# EAGLE board ecad-flight-controller-v4-ascend-flight-controllerv4-brd (EAGLE 9.7.0)
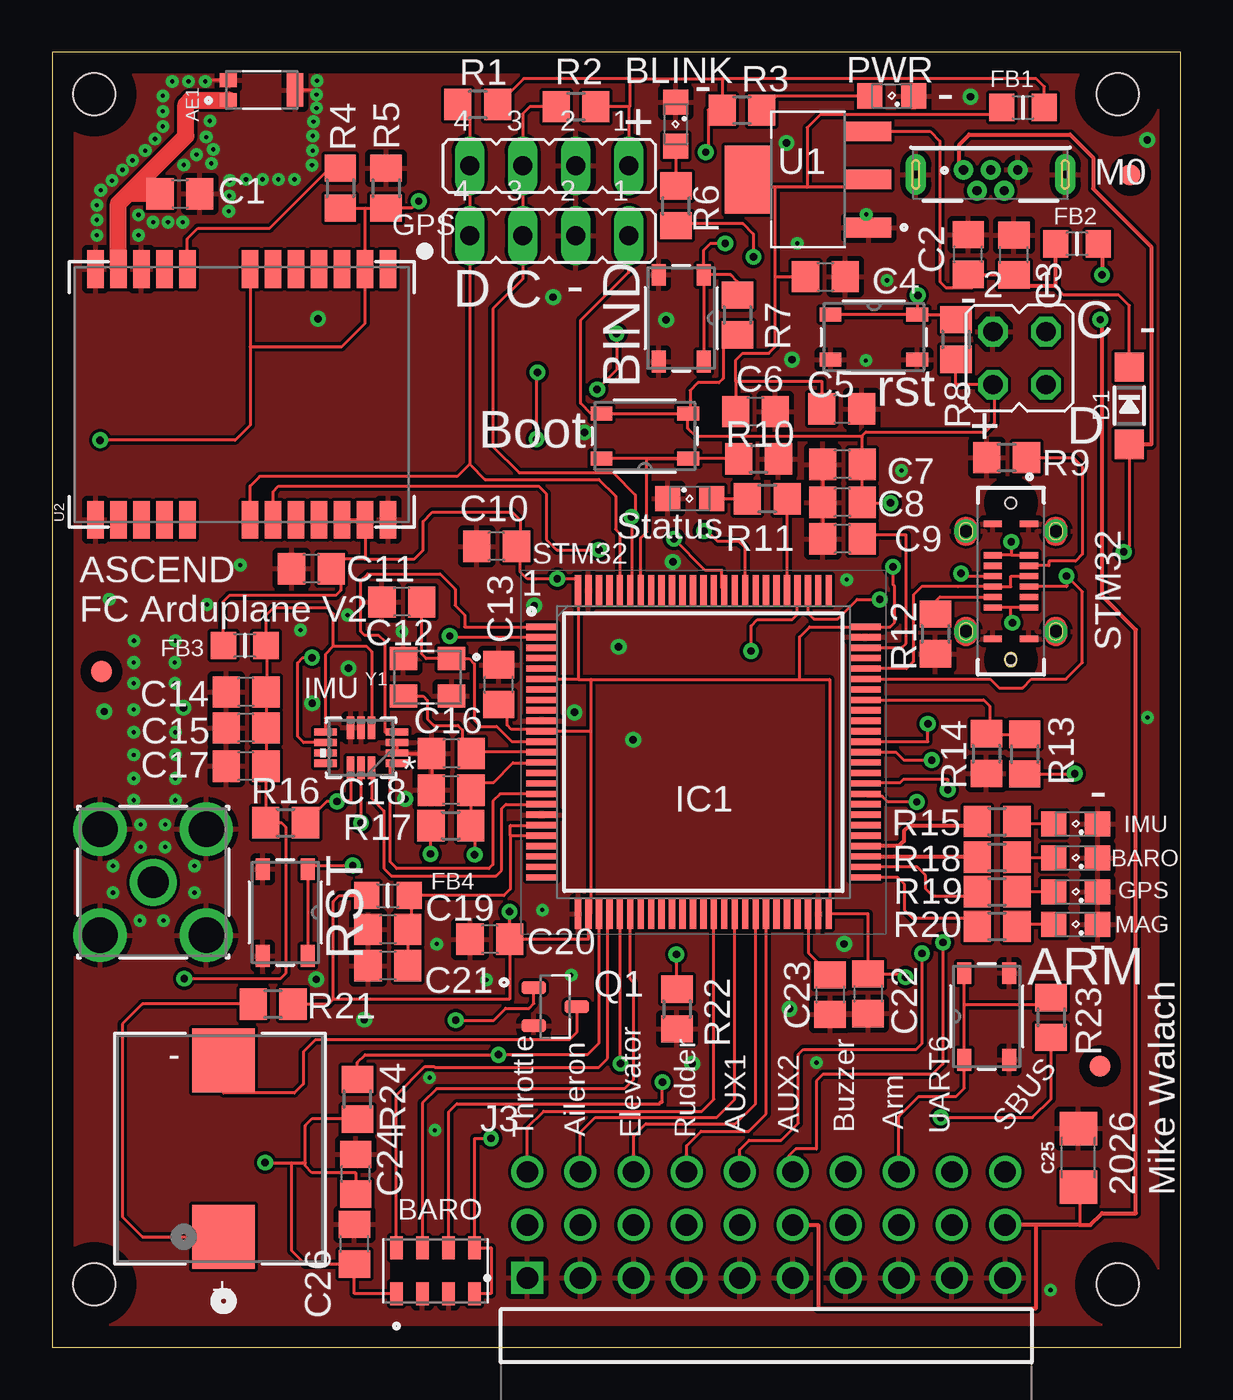
[diagram p0: board, top side]
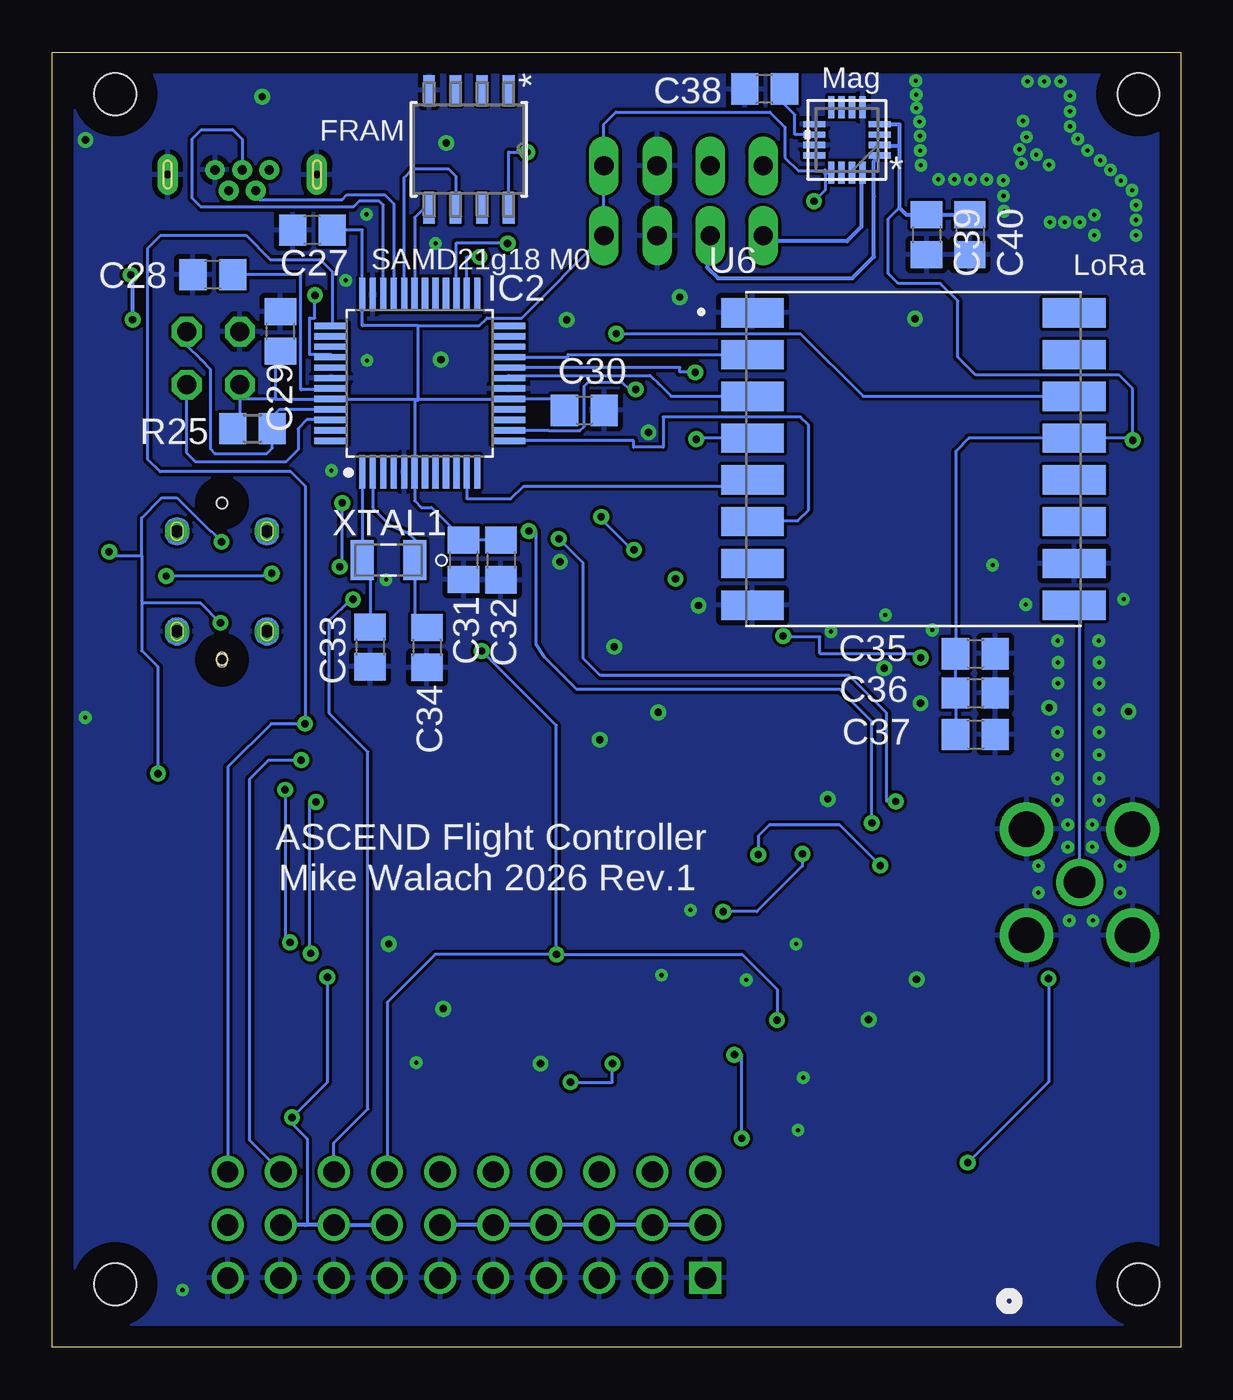
[diagram p1: board, bottom side, seen from below]

Size 54 x 62 mm. Coordinates in mm from the lower left corner, seen from the top.
Outline: 0,0 54,0 54,62 0,62 0,0
Copper layers (1*16): Top 0.035mm / dielectric 1.5mm / Bottom 0.035mm
Design rules "Fusion Electronics Design Rules": minimum track width 6mil, minimum drill 0.35mm, track to track 6mil, track to pad 6mil, pad to pad 6mil, via to via 6mil, smd to smd 6mil, copper to edge 40mil, drill to drill 6mil, minimum pad ring 10mil, minimum via ring 8mil, stop-mask expansion 4mil, vias tented up to drill 9999mil, thermal gap 10mil
Holes 2 mm at 2.02,3.02 50.98,3.02 50.98,59.98 2.02,59.98

## Footprints (pad centres in the part's own frame; a part is rotated, then mirrored left to right if it is on the bottom)
XDCR_MS561101BA03-50 = smd 1.1 x 0.6: 1 -1.1,1.875; 2 -1.1,0.625; 3 -1.1,-0.625; 4 -1.1,-1.875; 5 1.1,-1.875; 6 1.1,-0.625; 7 1.1,0.625; 8 1.1,1.875
XDCR_W3011 = smd 0.65 x 0.8: 1 -0.475,1.6; 2 0.475,1.6 | smd 1.6 x 0.8: 3 0,-1.6
SML0805 = smd 1.2 x 1.2: A 1.05,0; C -1.05,0
C0805 = smd 1.3 x 1.5: 1 -0.95,0; 2 0.95,0
1206 = smd 1.6 x 1.8: 1 -1.4,0; 2 1.4,0
MICROBUILDER_SOD-123 = smd 1.4 x 1.4: A 1.85,0; C -1.85,0
RC-MASTER-SMD_L0805MP = smd 1.2 x 1.3: 1 -1.016,0; 2 1.016,0
FIDUCIAL_1MM = smd 1 x 1: 1 0,0
QFP50P1600X1600X160-100N = smd 1.475 x 0.3: 1 -7.738,6; 2 -7.738,5.5; 3 -7.738,5; 4 -7.738,4.5; 5 -7.738,4; 6 -7.738,3.5; 7 -7.738,3; 8 -7.738,2.5; 9 -7.738,2; 10 -7.738,1.5; 11 -7.738,1; 12 -7.738,0.5; 13 -7.738,0; 14 -7.738,-0.5; 15 -7.738,-1; 16 -7.738,-1.5; 17 -7.738,-2; 18 -7.738,-2.5; 19 -7.738,-3; 20 -7.738,-3.5; 21 -7.738,-4; 22 -7.738,-4.5; 23 -7.738,-5; 24 -7.738,-5.5; 25 -7.738,-6; 51 7.738,-6; 52 7.738,-5.5; 53 7.738,-5; 54 7.738,-4.5; 55 7.738,-4; 56 7.738,-3.5; 57 7.738,-3; 58 7.738,-2.5; 59 7.738,-2; 60 7.738,-1.5; 61 7.738,-1; 62 7.738,-0.5; 63 7.738,0; 64 7.738,0.5; 65 7.738,1; 66 7.738,1.5; 67 7.738,2; 68 7.738,2.5; 69 7.738,3; 70 7.738,3.5; 71 7.738,4; 72 7.738,4.5; 73 7.738,5; 74 7.738,5.5; 75 7.738,6 | smd 0.3 x 1.475: 26 -6,-7.738; 27 -5.5,-7.738; 28 -5,-7.738; 29 -4.5,-7.738; 30 -4,-7.738; 31 -3.5,-7.738; 32 -3,-7.738; 33 -2.5,-7.738; 34 -2,-7.738; 35 -1.5,-7.738; 36 -1,-7.738; 37 -0.5,-7.738; 38 0,-7.738; 39 0.5,-7.738; 40 1,-7.738; 41 1.5,-7.738; 42 2,-7.738; 43 2.5,-7.738; 44 3,-7.738; 45 3.5,-7.738; 46 4,-7.738; 47 4.5,-7.738; 48 5,-7.738; 49 5.5,-7.738; 50 6,-7.738; 76 6,7.738; 77 5.5,7.738; 78 5,7.738; 79 4.5,7.738; 80 4,7.738; 81 3.5,7.738; 82 3,7.738; 83 2.5,7.738; 84 2,7.738; 85 1.5,7.738; 86 1,7.738; 87 0.5,7.738; 88 0,7.738; 89 -0.5,7.738; 90 -1,7.738; 91 -1.5,7.738; 92 -2,7.738; 93 -2.5,7.738; 94 -3,7.738; 95 -3.5,7.738; 96 -4,7.738; 97 -4.5,7.738; 98 -5,7.738; 99 -5.5,7.738; 100 -6,7.738
QFP50P900X900X120-48 = smd 1.6 x 0.3: 1 -4.25,2.75; 2 -4.25,2.25; 3 -4.25,1.75; 4 -4.25,1.25; 5 -4.25,0.75; 6 -4.25,0.25; 7 -4.25,-0.25; 8 -4.25,-0.75; 9 -4.25,-1.25; 10 -4.25,-1.75; 11 -4.25,-2.25; 12 -4.25,-2.75; 25 4.25,-2.75; 26 4.25,-2.25; 27 4.25,-1.75; 28 4.25,-1.25; 29 4.25,-0.75; 30 4.25,-0.25; 31 4.25,0.25; 32 4.25,0.75; 33 4.25,1.25; 34 4.25,1.75; 35 4.25,2.25; 36 4.25,2.75 | smd 0.3 x 1.6: 13 -2.75,-4.25; 14 -2.25,-4.25; 15 -1.75,-4.25; 16 -1.25,-4.25; 17 -0.75,-4.25; 18 -0.25,-4.25; 19 0.25,-4.25; 20 0.75,-4.25; 21 1.25,-4.25; 22 1.75,-4.25; 23 2.25,-4.25; 24 2.75,-4.25; 37 2.75,4.25; 38 2.25,4.25; 39 1.75,4.25; 40 1.25,4.25; 41 0.75,4.25; 42 0.25,4.25; 43 -0.25,4.25; 44 -0.75,4.25; 45 -1.25,4.25; 46 -1.75,4.25; 47 -2.25,4.25; 48 -2.75,4.25
614105150721 = drill 0.44: 1 -1.3,0.125; 2 -0.65,-0.875; 3 0,0.125; 4 0.65,-0.875; 5 1.3,0.125 | drill 0.35 pad 0.97 long: S1 -3.575,-0.095; S2 3.575,-0.095
GCT_USB4120-03-C_REVA6 = smd 0.3 x 0.87: A1 -2.75,0.865; A4 -1.25,0.865; A5 -0.75,0.865; A6 -0.25,0.865; A7 0.25,0.865; A8 0.75,0.865; A9 1.25,0.865; A12 2.75,0.865; B1 2.75,-0.865; B4 1.25,-0.865; B5 0.75,-0.865; B6 0.25,-0.865; B7 -0.25,-0.865; B8 -0.75,-0.865; B9 -1.25,-0.865; B12 -2.75,-0.865 | drill 0.6 pad 1.1: S1 -2.4,2.15; S2 -2.4,-2.15; S3 2.4,2.15; S4 2.4,-2.15 | hole 0.52: -3.75,0; 3.75,0
SAMTEC_TSW-110-08-G-T-RA = drill 1.02 pad 1.37 square: 01 -11.43,2.77 | drill 1.02 pad 1.37: 02 -11.43,5.31; 03 -11.43,7.85; 04 -8.89,2.77; 05 -8.89,5.31; 06 -8.89,7.85; 07 -6.35,2.77; 08 -6.35,5.31; 09 -6.35,7.85; 10 -3.81,2.77; 11 -3.81,5.31; 12 -3.81,7.85; 13 -1.27,2.77; 14 -1.27,5.31; 15 -1.27,7.85; 16 1.27,2.77; 17 1.27,5.31; 18 1.27,7.85; 19 3.81,2.77; 20 3.81,5.31; 21 3.81,7.85; 22 6.35,2.77; 23 6.35,5.31; 24 6.35,7.85; 25 8.89,2.77; 26 8.89,5.31; 27 8.89,7.85; 28 11.43,2.77; 29 11.43,5.31; 30 11.43,7.85
JUMPER_1_JP4 = drill 0.914 long: 1 -3.81,0; 2 -1.27,0; 3 1.27,0; 4 3.81,0
JP2Q = drill 0.914 octagon: 1 -1.27,-1.27; 2 -1.27,1.27; 3 1.27,-1.27; 4 1.27,1.27
SMTB-0927-TW-R_PUI = smd 3.048 x 2.997: 1 -4.225,-0.172; 2 4.225,-0.172
SOT91P240X110-3N = smd 1.18 x 0.61: 1 -1.025,0.915; 2 -1.025,-0.915; 3 1.025,0
R0805 = smd 1.3 x 1.5: 1 -0.95,0; 2 0.95,0
PTS810 = smd 1.041 x 0.66: 1 -2.075,1.075; 2 2.075,1.075; 3 -2.075,-1.075; 4 2.075,-1.075
VREG_TLV1117LV33DCYR = smd 2.15 x 0.95: 1 -2.9,2.3; 2 -2.9,0; 3 -2.9,-2.3 | smd 2.15 x 3.25: 4 2.9,0
GPS_NEO-M9N = smd 1.8 x 0.8: 1 6,-7; 2 6,-5.9; 3 6,-4.8; 4 6,-3.7; 5 6,-2.6; 6 6,-1.5; 7 6,-0.4; 8 6,2.6; 9 6,3.7; 10 6,4.8; 11 6,5.9; 12 6,7; 13 -6,7; 14 -6,5.9; 15 -6,4.8; 16 -6,3.7; 17 -6,2.6; 18 -6,-0.4; 19 -6,-1.5; 20 -6,-2.6; 21 -6,-3.7; 22 -6,-4.8; 23 -6,-5.9; 24 -6,-7
LGA-14L_2P5X3X0P83_STM = smd 1.077 x 0.351: 1 -1.71,0.75; 2 -1.71,0.25; 3 -1.71,-0.25; 4 -1.71,-0.75; 8 1.71,-0.75; 9 1.71,-0.25; 10 1.71,0.25; 11 1.71,0.75 | smd 0.351 x 1.077: 5 -0.5,-0.956; 6 0,-0.956; 7 0.5,-0.956; 12 0.5,0.956; 13 0,0.956; 14 -0.5,0.956
132134_AMP = drill 1.499 pad 2.007: 1 0,0 | drill 1.702 pad 2.21: 2 -2.54,2.54; 3 -2.54,-2.54; 4 2.54,-2.54; 5 2.54,2.54
FPT-8P-M02_FUJ = smd 1.448 x 0.559: 1 -2.832,1.905; 2 -2.832,0.635; 3 -2.832,-0.635; 4 -2.832,-1.905; 5 2.832,-1.905; 6 2.832,-0.635; 7 2.832,0.635; 8 2.832,1.905
XCVR_RFM95W-915S2 = smd 3 x 1.4: 1 -7.7,7; 2 -7.7,5; 3 -7.7,3; 4 -7.7,1; 5 -7.7,-1; 6 -7.7,-3; 7 -7.7,-5; 8 -7.7,-7; 9 7.7,-7; 10 7.7,-5; 11 7.7,-3; 12 7.7,-1; 13 7.7,1; 14 7.7,3; 15 7.7,5; 16 7.7,7
MMC5983MA_MEM = smd 1.054 x 0.305: 1 -1.573,0.75; 2 -1.573,0.25; 3 -1.573,-0.25; 4 -1.573,-0.75; 9 1.573,-0.75; 10 1.573,-0.25; 11 1.573,0.25; 12 1.573,0.75 | smd 0.305 x 1.054: 5 -0.75,-1.573; 6 -0.25,-1.573; 7 0.25,-1.573; 8 0.75,-1.573; 13 0.75,1.573; 14 0.25,1.573; 15 -0.25,1.573; 16 -0.75,1.573
XTAL_ABS07-32.768KHZ-T = smd 1.1 x 1.9: 1 -1.25,0; 2 1.25,0
XTAL_ECS-240-8-33-AGN-TR = smd 1.3 x 1.1: 1 -1.15,-0.9; 2 1.15,-0.9; 3 1.15,0.9; 4 -1.15,0.9

## Placement (x,y rotation side)
A1  MS561101BA03-50  [XDCR_MS561101BA03-50]  18.34,3.67 90 top
AE1  W3011  [XDCR_W3011]  10.02,60.18 90 top
BLINK  [SML0805]  29.84,58.55 270 top
C1  2.2pF  [C0805]  6.11,55.22 0 top
C2  10uF  [C0805]  43.83,52.31 90 top
C3  100nF  [C0805]  46.02,52.29 90 top
C4  0.1uF  [C0805]  37,51.25 0 top
C5  1uF  [C0805]  37.78,44.92 0 top
C6  10uF  [C0805]  33.66,44.8 0 top
C7  4.7uF  [C0805]  37.82,42.27 180 top
C8  100nF  [C0805]  37.82,40.45 180 top
C9  2.2uF  [C0805]  37.82,38.7 180 top
C10  100nF  [C0805]  21.27,38.34 180 top
C11  0.1uF  [C0805]  12.4,37.27 180 top
C12  18pF  [C0805]  16.73,35.68 180 top
C13  100nF  [C0805]  21.37,31.72 90 top
C14  100nF  [C0805]  9.28,31.37 180 top
C15  1uF  [C0805]  9.28,29.65 180 top
C16  18pF  [C0805]  19.1,28.43 180 top
C17  100nF  [C0805]  9.28,27.82 180 top
C18  100nF  [C0805]  19.09,26.67 180 top
C19  100nF  [C0805]  16.06,20.01 180 top
C20  100nF  [C0805]  20.95,19.53 180 top
C21  1uF  [C0805]  16.06,18.27 180 top
C22  100nF  [C0805]  39.05,16.92 270 top
C23  2.2uF  [C0805]  37.23,16.88 270 top
C24  1uF  [C0805]  14.52,8.29 90 top
C25  220uF  [1206]  49.11,9.08 90 top
C26  100nF  [C0805]  14.46,4.93 90 top
C27  0.1uF  [C0805]  41.54,53.48 180 bottom
C28  1uF  [C0805]  46.32,51.35 180 bottom
C29  0.1uF  [C0805]  43.08,48.64 90 bottom
C30  0.1uF  [C0805]  28.54,44.86 0 bottom
C31  1uF  [C0805]  34.31,37.7 270 bottom
C32  0.1uF  [C0805]  32.52,37.69 270 bottom
C33  22pF  [C0805]  38.79,33.53 270 bottom
C34  22pF  [C0805]  36.07,33.5 270 bottom
C35  10uF  [C0805]  9.82,33.21 0 bottom
C36  0.1uF  [C0805]  9.82,31.32 0 bottom
C37  1uF  [C0805]  9.82,29.34 0 bottom
C38  10uF  [C0805]  19.91,60.23 180 bottom
C39  100nF  [C0805]  12.16,53.27 270 bottom
C40  100nF  [C0805]  10.09,53.27 270 bottom
D1  [MICROBUILDER_SOD-123]  51.54,45.08 270 top
FB1  [RC-MASTER-SMD_L0805MP]  46.46,59.36 0 top
FB2  [RC-MASTER-SMD_L0805MP]  49.04,52.82 180 top
FB3  [RC-MASTER-SMD_L0805MP]  9.21,33.6 180 top
FB4  [RC-MASTER-SMD_L0805MP]  16.06,21.63 0 top
FID1  FIDUCIAL""  [FIDUCIAL_1MM]  2.35,32.35 0 top
FID2  FIDUCIAL""  [FIDUCIAL_1MM]  51.59,56.12 0 top
FID3  FIDUCIAL""  [FIDUCIAL_1MM]  50.14,13.46 0 top
IC1  STM32H743VIT6  [QFP50P1600X1600X160-100N]  31.16,28.49 0 top
IC2  ATSAMD21G  [QFP50P900X900X120-48]  36.41,46.15 90 bottom
J1  614105150721  [614105150721]  44.91,56.24 0 top
J2  USB4120-03-C_REVA6  [GCT_USB4120-03-C_REVA6]  45.88,36.67 270 top
J3  TSW-110-08-G-T-RA  [SAMTEC_TSW-110-08-G-T-RA]  34.17,0.55 0 top
JP1  [JUMPER_1_JP4]  23.79,56.56 180 top
JP2  [JUMPER_1_JP4]  23.79,53.22 180 top
JP3  [JP2Q]  46.29,47.35 180 top
LED4  [SML0805]  48.97,25.05 180 top
LED5  [SML0805]  48.97,23.42 180 top
LED6  [SML0805]  48.97,21.8 180 top
LED7  [SML0805]  48.97,20.24 180 top
LS1  SMTB-0927-TW-RSMTB-0927-TW-R_PUI  [SMTB-0927-TW-R_PUI]  8.03,9.51 90 top
PWR  [SML0805]  40.17,59.91 180 top
Q1  2N7002K-7  [SOT91P240X110-3N]  24.07,16.31 0 top
R1  10k  [R0805]  20.36,59.49 180 top
R2  10k  [R0805]  25.07,59.39 180 top
R3  2.2K  [R0805]  33.01,59.23 0 top
R4  1K  [R0805]  13.79,55.49 270 top
R5  100K  [R0805]  15.98,55.49 270 top
R6  2.2K  [R0805]  29.85,54.65 90 top
R7  1K  [R0805]  32.79,49.42 270 top
R8  1K  [R0805]  43.25,48.25 270 top
R9  5.1K  [R0805]  45.68,42.59 180 top
R10  10k  [R0805]  33.8,42.53 0 top
R11  2.2K  [R0805]  34.22,40.62 180 top
R12  5.1K  [R0805]  42.27,34.15 270 top
R13  4.7k  [R0805]  46.54,28.4 90 top
R14  10k  [R0805]  44.71,28.42 270 top
R15  2.2K  [R0805]  45.22,25.17 0 top
R16  10k  [R0805]  11.17,25.11 0 top
R17  10k  [R0805]  19.07,24.98 0 top
R18  2.2K  [R0805]  45.22,23.46 0 top
R19  2.2K  [R0805]  45.22,21.8 0 top
R20  2.2K  [R0805]  45.22,20.15 0 top
R21  0-100  [R0805]  10.57,16.43 180 top
R22  100k  [R0805]  29.89,16.19 270 top
R23  1K  [R0805]  47.8,15.79 270 top
R24  10k  [R0805]  14.6,11.88 90 top
R25  1K  [R0805]  44.42,43.98 0 bottom
STATUS  [SML0805]  30.51,40.64 0 top
SW1  PTS810SJG250SMTRLFSPTS810  [PTS810]  30.1,49.27 270 top
SW2  PTS810SJG250SMTRLFSPTS810  [PTS810]  39.32,48.36 0 top
SW3  PTS810SJG250SMTRLFSPTS810  [PTS810]  28.36,43.62 180 top
SW4  PTS810SJG250SMTRLFSPTS810  [PTS810]  11.15,20.81 270 top
SW5  PTS810SJG250SMTRLFSPTS810  [PTS810]  44.73,15.84 90 top
U1  TLV1117LV33DCYR  [VREG_TLV1117LV33DCYR]  36.17,55.91 180 top
U2  GPS_U-BLOX_NEO-M9N  [GPS_NEO-M9N]  9.07,45.62 90 top
U3  LSM6DSO32TRLGA-14L_2P5X3X0P83_STM  [LGA-14L_2P5X3X0P83_STM]  14.78,28.7 180 top
U4  132134132134_AMP  [132134_AMP]  4.83,22.27 0 top
U5  MB85RC256VPNF-G-JNERE1FPT-8P-M02_FUJ  [FPT-8P-M02_FUJ]  34.06,57.35 270 bottom
U6  RFM95W-915S2  [XCVR_RFM95W-915S2]  12.79,42.53 0 bottom
U7  MMC5983MAMMC5983MA_MEM  [MMC5983MA_MEM]  15.97,57.8 180 bottom
XTAL1  32.768kHz  [XTAL_ABS07-32.768KHZ-T]  37.91,37.69 180 bottom
Y1  ECS-80-12-33-JGN-TR3  [XTAL_ECS-240-8-33-AGN-TR]  17.96,32.07 180 top

## Library data of the parts
A1 = MS561101BA03-50; MANUFACTURER: TE Connectivity; MAXIMUM_PACKAGE_HEIGHT: 1.1mm; PARTREV: 06/2017; STANDARD: Manufacturer Recommendations
AE1 = W3011; MANUFACTURER: PulseLarsen; MAXIMUM_PACKAGE_HEIGHT: 1.3 mm; PARTREV: N/A; STANDARD: Manufacturer recommendations
BLINK LED4-LED7 PWR STATUS = led
C1-C24 C26-C40 = rcl; SPICEPREFIX: C
C25 = SparkFun-Capacitors; PROD_ID: CAP-09822
D1 = flightcomputer-2023
FB1-FB4 = 52101-101-REV-A_v16
FID1-FID3 = Airquality_Sensor; BOM: EXCLUDE
IC1 = STM32H743VIT6; DESCRIPTION: ARM Microcontrollers - MCU High-performance and DSP with DP-FPU, ARM Cortex-M7 MCU with 2MBytes Flash, 1MB RAM, 400 MHz CPU, Art Accelerator, L1 cache, external memory interface, large set of peripherals; HEIGHT: 1.6mm; MANUFACTURER_NAME: STMicroelectronics; MANUFACTURER_PART_NUMBER: STM32H743VIT6; MOUSER_PART_NUMBER: 511-STM32H743VIT6; MOUSER_PRICE-STOCK: https://www.mouser.co.uk/ProductDetail/STMicroelectronics/STM32H743VIT6?qs=FNcb6ahWXRw0Me5k2ZHgWw%3D%3D
IC2 = IC_Embedded; CATEGORY: IC_Embedded; CORE: ARM Cortex M0+; DESCRIPTION: Low-power, high-performance Microchip's ARM® Cortex®-M0+ based flash microcontroller; MANUFACTURER: Microchip Technology; MPN: ATSAMD21G; OPERATING_TEMP: variable; PACKAGE: TQFP-48; PART_STATUS: Active; ROHS_COMPLIANT: COMPLIANT; SERIES: SAM D21G; SUB-CATEGORY: Microcontroller; TYPE: 32 bit Microcontroller
J1 = 614105150721
J2 = USB4120-03-C_REVA6; MANUFACTURER: Global Connector Technology; MAXIMUM_PACKAGE_HEIGHT: 6.5mm; PARTREV: A6; SNAPEDA_PN: USB4120-03-C; STANDARD: Manufacturer Recommendations
J3 = TSW-110-08-G-T-RA; MANUFACTURER: Samtec; PARTREV: R; STANDARD: Manufacturer Recommendations
JP1 JP2 = BOBCAT_Library
JP3 = jumper
LS1 = 2026-06-20_23-40-30_Library; COPYRIGHT: Copyright (C) 2026 Ultra Librarian. All rights reserved.; MANUFACTURER_NAME: PUI Audio; MANUFACTURER_PART_NUMBER: SMTB-0927-TW-R
Q1 = 2N7002K-7; MANUFACTURER: Diodes Inc.; MAXIMUM_PACKAGE_HIEGHT: 1.1mm; PARTREV: 15-2; STANDARD: IPC7351B
R1-R25 = rcl; SPICEPREFIX: R
SW1-SW5 = 2024-06-17_17-27-14_Library; COPYRIGHT: Copyright (C) 2024 Ultra Librarian. All rights reserved.; MANUFACTURER_PART_NUMBER: PTS810SJG250SMTRLFS; MFR_NAME: C&K Components
U1 = TLV1117LV33DCYR; MANUFACTURER: Texas Instruments; MAXIMUM_PACKAGE_HEIGHT: 1.80 mm; PARTREV: B; STANDARD: IPC-7351B
U2 = SparkFun GPS NEO_M9N_ANT; PROD_ID: IC-14651
U3 = LSM6DSO32TR_extendedpads_fixed_v2; COPYRIGHT: Copyright (C) 2026 Ultra Librarian. All rights reserved.; DATASHEET: https://www.st.com/resource/en/datasheet/lsm6dso32.pdf; DESCRIPTION: 6-axis IMU (inertial measurement unit): 3-axis accelerometer and 3-axis gyroscope; MANUFACTURER_NAME: STMicroelectronics; MANUFACTURER_PART_NUMBER: LSM6DSO32TR
U4 = 2025-03-19_02-22-58_Library; COPYRIGHT: Copyright (C) 2025 Ultra Librarian. All rights reserved.; MANUFACTURER_PART_NUMBER: 132134; MFR_NAME: Amphenol ICC
U5 = 2025-09-02_13-41-18_Library; COPYRIGHT: Copyright (C) 2025 Ultra Librarian. All rights reserved.; MANUFACTURER_NAME: Fujitsu Semiconductor; MANUFACTURER_PART_NUMBER: MB85RC256VPNF-G-JNERE1
U6 = RFM95W-915S2; AVAILABILITY: In Stock; CHECK_PRICES: https://www.snapeda.com/parts/RFM95W-915S2/RF/view-part/?ref=eda; DESCRIPTION: 802.15.4 LoRa™ Transceiver Module 915MHz Antenna Not Included Surface Mount; MF: RF Solutions; MP: RFM95W-915S2; PACKAGE: Non Standard RF Solutions; PRICE: None; PURCHASE-URL: https://www.snapeda.com/api/url_track_click_mouser/?unipart_id=585488&manufacturer=RF Solutions&part_name=RFM95W-915S2&search_term=None; SNAPEDA_LINK: https://www.snapeda.com/parts/RFM95W-915S2/RF/view-part/?ref=snap
U7 = MMC5983MA_SAME_SYMBOL_HANDSOLDER; COPYRIGHT: Copyright (C) 2026 Ultra Librarian. All rights reserved.; MANUFACTURER_NAME: Memsic; MANUFACTURER_PART_NUMBER: MMC5983MA
XTAL1 = Crystal-WA; CATEGORY: Crystal; MANUFACTURER: Abracon LLC; MPN: ABS07-32.768KHZ-T; OPERATING_TEMPERATURE: -40°C ~ 85°C; PART_STATUS: ACTIVE; ROHS_COMPLIANT: COMPLIANT; SERIES: ABS07; SUB_CATEGORY: Crystal Surface Mount; TYPE: Crystal
Y1 = ECS-80-12-33-JGN-TR3; AVAILABILITY: Good; DESCRIPTION: The sub miniature ECX-32 is a compact SMD Crystal.; MF: ECS INC; MP: ECX-32; PACKAGE: SMD-4 ECX; STANDARD: Manufacturer recommendations

## Nets
5V-SERVO-RAIL: C25.1 FB2.1 J3.02 J3.05 J3.08 J3.11 J3.14 J3.17 J3.29
+3V3: C7.1 C8.1 C10.1 C11.1 C13.1 C20.1 C22.1 C27.1 C29.1 C30.1 C31.1 C32.1 C35.1 C36.1 C37.1 C39.1 C40.1 FB1.2 FB3.2 FB4.1 IC1.6 IC1.11 IC1.27 IC1.50 IC1.75 IC1.100 IC2.6 IC2.17 IC2.36 IC2.44 J3.20 J3.23 J3.26 JP1.1 JP2.1 JP3.4 R1.1 R2.1 R3.1 R4.2 R5.2 R7.2 R8.2 R17.1 R21.1 R23.2 R25.1 SW3.3 SW3.4 U2.2 U2.7 U2.22 U2.23 U5.8 U6.13 U7.2 U7.4 U7.13
A0: IC2.3
A1: IC2.7
A2: IC2.8
A3: IC2.9
A4: IC2.10
A5: IC2.47
ACCEL_CS: IC1.85
AILERON: IC1.41 J3.06
AREF: IC2.4
ARMING_BUTTON: IC1.78 J3.24 R23.1 SW5.1 SW5.2
AUX1: IC1.59 J3.15
AUX2: IC1.60 J3.18
BARO_CS: A1.4 A1.5 IC1.28 R24.2
BIND: IC2.27 R7.1 SW1.1 SW1.2
BLINK: IC1.80 R11.1
BOOT0: IC1.94 R10.1 SW3.1 SW3.2
BUZZER: IC1.79 J3.21 Q1.1 R22.1
D0: IC2.16
D1: IC2.15
D2: IC2.23
D5: IC2.24
D6: IC2.29
D7: IC2.30
D9: IC2.12
D12: IC2.28
D13: IC2.26 R6.1
D+: IC2.34 J1.3
D-: IC2.33 J1.2
DIO0: IC2.14 U6.14
DIO1: U6.15
DIO2: U6.16
DIO3: U6.11
DIO4: U6.12
DIO5: U6.7
ELEVATOR: IC1.43 J3.09
FILTERED-3.3V: A1.1 C14.1 C15.1 C17.1 C24.1 C26.1 FB3.1 R16.1 R24.1 U3.5 U3.8
GND: A1.2 A1.3 AE1.2 AE1.3 BLINK.C C1.2 C2.2 C3.2 C4.2 C5.2 C6.2 C7.2 C8.2 C9.2 C10.2 C11.2 C12.2 C13.2 C14.2 C15.2 C16.2 C17.2 C18.2 C19.2 C20.2 C21.2 C22.2 C23.2 C24.2 C25.2 C26.2 C27.2 C28.2 C29.2 C30.2 C31.2 C32.2 C33.2 C34.2 C35.2 C36.2 C37.2 C38.2 C39.2 C40.2 IC1.10 IC1.19 IC1.26 IC1.49 IC1.74 IC1.99 IC2.5 IC2.18 IC2.35 IC2.42 J1.5 J1.S1 J1.S2 J2.A1 J2.A12 J2.B1 J2.B12 J2.S1 J2.S2 J2.S3 J2.S4 J3.01 J3.04 J3.07 J3.10 J3.13 J3.16 J3.19 J3.22 J3.25 J3.28 JP1.2 JP2.2 JP3.3 LED4.C LED5.C LED6.C LED7.C PWR.C Q1.2 R5.1 R9.2 R10.2 R12.2 R14.2 R22.2 STATUS.C SW1.3 SW1.4 SW2.3 SW2.4 SW4.3 SW4.4 SW5.3 SW5.4 U1.1 U2.10 U2.12 U2.13 U2.24 U3.2 U3.3 U3.6 U3.7 U4.2 U4.3 U4.4 U4.5 U5.4 U6.1 U6.8 U6.10 U7.5 U7.9 U7.11 Y1.2 Y1.4
GPS-HEALTH: IC1.52 R19.1
GPS_ANT1: AE1.1 C1.1 U2.11
GYRO_CS: IC1.86 R16.2 U3.12
I2C1_SCL: IC1.95 JP1.3 JP2.3 R2.2 U2.19 U7.1
I2C1_SDA: IC1.96 JP1.4 JP2.4 R1.2 U2.18 U7.16
IMU-HEALTH: IC1.54 R15.1
IMU_INT1: IC1.1 U3.4
IMU_INT2: IC1.2 U3.9
LORA_ANT: U4.1 U6.9
LORA_RESET: IC2.13 U6.6
MAGNATOMETER-HEALTH: IC1.51 R20.1
MISO: IC2.21 U6.2
MOSI: IC2.19 U6.3
N$1: C9.1 IC1.73
N$2: C23.1 IC1.48
N$3: C19.1 C21.1 FB4.2 IC1.20 IC1.21
N$4: R4.1 U2.8
N$5: LS1.1 R21.2
N$6: LS1.2 Q1.3
N$7: LED4.A R15.2
N$8: R11.2 STATUS.A
N$9: C4.1 C5.1 C6.1 FB1.1 U1.2 U1.4
N$11: C2.1 C3.1 D1.C FB2.2 U1.3
N$12: LED5.A R18.2
N$13: C28.1 IC2.43
N$14: LED6.A R19.2
N$15: LED7.A R20.2
N$16: C34.1 IC2.2 XTAL1.1
N$17: C33.1 IC2.1 XTAL1.2
N$19: BLINK.A R6.2
N$20: U5.7
N$21: U5.3
N$22: U5.2
N$23: U5.1
N$27: C38.1 U7.10
N$30: PWR.A R3.2
N$33: J2.A5 R9.1
N$34: J2.B5 R12.1
NRST: C18.1 IC1.14 R17.2 SW4.1 SW4.2
NSS: IC2.11 U6.5
OSC-IN: C12.1 IC1.12 Y1.1
OSC-OUT: C16.1 IC1.13 Y1.3
PRESSURE-HEALTH: IC1.53 R18.1
RCIN_SBUS: IC1.64 IC2.37 J3.30
RESET: IC2.40 R8.1 SW2.1 SW2.2
RUDDER: IC1.44 J3.12
RXD: IC2.38
RXLED: IC2.48
SCK: IC2.20 U6.4
SCL: IC2.32 U5.6
SDA: IC2.31 U5.5
SPI1_MISO: A1.6 IC1.30
SPI1_MOSI: A1.7 IC1.31
SPI1_SCK: A1.8 IC1.29
SPI2_MISO: IC1.17 U3.1
SPI2_MOSI: IC1.18 U3.14
SPI2_SCK: IC1.84 U3.13
SW3: IC2.25
SWCLK: IC2.45 JP3.1 R25.2
SWCLK_STM32: IC1.76
SWDIO: IC2.46 JP3.2
SWDIO_STM32: IC1.72
THROTTLE: IC1.39 J3.03
TXLED: IC2.39
USART1_RX: IC1.93
USART1_TX: IC1.92
USART6_TX: IC1.63 J3.27
USB_5V: D1.A J1.1 J2.A4 J2.A9 J2.B4 J2.B9 R13.1
USB_D+: IC1.71 J2.A6 J2.B6
USB_D−: IC1.70 J2.A7 J2.B7
USB_VBUS_SENSE: IC1.68 R13.2 R14.1

## Tracks (layer width: path | path; a pad name or v marks a point on that pad's centre or on a via)
5V-SERVO-RAIL  (via drill 0.35)
  Top 0.152: C25.1 49.17,7.62 49.17,5.86
  Top 0.203: v50.24,51.34 50.24,52.82 FB2.1 | v50.15,49.2 50.24,49.11 50.24,35.96 51.86,34.34 51.86,6.42 50.24,6.42 49.68,5.86 49.17,5.86 47.09,5.86 | J3.17 36.66,5.86 36.66,1.87 47.09,1.87 47.09,5.86 | 47.09,5.86 J3.29
  Bottom 0.203: v50.15,49.2 50.15,51.34 v50.24,51.34 | J3.02 J3.05 J3.08 J3.11 J3.14 J3.17
+3V3  (via drill 0.35)
  Top 0.152: C20.1 25.66,19.53 IC1.27 25.78,20.75 25.78,29.49 | R17.1 18.12,23.61 v18.1,23.61 | v21.88,20.86 21.88,19.53 C20.1 | C20.1 21.9,16.66 13.46,16.66 | 13.46,16.66 13.46,21.34 13.75,21.63 FB4.1 | R7.2 32.79,48.36 | 32.79,48.36 32.79,48.14 | 37.2,20.75 39.05,20.75 C22.1 40.83,17.87 v40.83,17.72 | 37.2,20.75 IC1.50 | SW3.4 26.56,44.7 | v40.12,40.42 38.77,40.42 C8.1 C7.1 38.77,43.59 38.71,43.59 | SW3.4 SW3.3 | 38.71,43.59 30.81,43.59 30.41,43.98 30.41,44.7 SW3.3 | SW3.3 30.52,44.7 30.52,45.8 30.9,46.18 31.9,46.18 32.11,46.39 32.11,48.36 32.79,48.36 | 27.6,59.39 27.64,59.39 27.64,60.74 | 27.6,59.39 R2.1 | 27.6,59.39 JP1.1 | 27.64,60.74 22.56,60.74 R1.1 | 27.64,60.74 32.06,60.74 | 32.06,60.74 R3.1 31.39,59.23 31.39,57.34 v31.27,57.22 | SW3.4 25.78,44.7 25.29,45.19 25.29,49.17 27.6,51.47 JP2.1 | 14.97,37.73 U2.23 U2.22 | 14.97,37.73 17.32,37.73 17.75,38.16 17.75,39.54 18.2,39.98 22.02,39.98 22.41,39.59 22.41,38.34 | 22.41,38.34 C10.1 | 22.41,38.34 22.41,37.12 22.74,36.79 v24.17,36.79 25.16,36.79 IC1.100 25.16,31.97 | 25.16,31.97 23.42,31.97 IC1.6 | 25.16,31.97 25.78,31.97 | 25.78,31.97 35.76,31.97 | 35.76,31.97 35.76,34.01 36.24,34.49 IC1.75 40.1,34.49 40.31,34.71 40.31,36.44 40.24,36.51 v40.24,37.36 | 25.78,31.97 25.78,29.49 | 35.76,31.97 37.2,31.97 37.2,20.75 | C13.1 21.77,30.37 21.77,29.78 21.97,29.58 23.34,29.58 IC1.11 25.78,29.49 | R8.2 43.25,46.08 JP3.4 45.1,46.08 45.1,44.27 44.66,43.82 38.94,43.82 38.71,43.59 | 14.97,37.73 13.35,37.73 C11.1 13.8,37.27 13.8,36.23 13.57,36 8.48,36 8.17,35.69 8.17,33.62 FB3.2 | v42.52,11 46.91,11 47.8,11.89 R23.2 | FB1.2 47.48,60.35 47.09,60.74 32.06,60.74
  Top 0.152: R21.1 13.23,16.43 13.46,16.66 | U2.7 9.47,47.9 | 9.47,47.9 9.47,44.14 8.76,43.43 v2.29,43.43 | v17.54,54.87 17.22,54.54 R5.2 14.99,54.54 | R4.2 14.99,54.54 | 14.99,54.54 14.97,54.52 U2.2 14.97,49.02 13.85,47.9 9.47,47.9
  Bottom 0.152: v18.1,23.61 18.1,23.03 20.28,20.86 v21.88,20.86 | v40.12,40.42 40.15,40.42 40.15,37.36 v40.24,37.36 | R25.1 45.02,43.98 45.02,45.4 | 45.02,45.4 JP3.4 | 43.33,45.4 IC2.44 36.51,45.4 | 43.33,45.4 45.02,45.4 | 34.29,38.65 35.84,40.21 36.33,40.21 36.66,40.53 IC2.6 36.66,45.33 36.51,45.33 | 34.29,38.65 C31.1 | C30.1 30.05,45.42 32.14,45.42 IC2.17 36.51,45.4 | 36.51,45.4 36.51,45.33 | 36.5,48.9 39.16,48.9 IC2.36 39.16,53.48 C27.1 | 36.5,48.9 36.5,45.33 36.51,45.33 | C29.1 43.33,47.69 43.33,45.4 | C32.1 34.29,38.64 34.29,38.65 | 10.67,31.32 10.74,31.32 | 10.74,31.32 C36.1 C35.1 | 36.5,48.9 33.57,48.9 33.19,49.28 31.53,49.28 JP2.1 JP1.1 27.6,58.56 27.02,59.13 19.65,59.13 18.93,58.42 18.93,56.96 18.31,56.33 17.01,56.33 17.01,55.41 v17.54,54.87 | v40.83,17.72 40.83,12.69 v42.52,11 42.52,10.69 41.8,9.97 41.8,5.86 41.88,5.86 | U5.8 32.16,57.22 v31.27,57.22 | 10.67,33.21 C35.1 | C37.1 10.74,29.34 10.74,31.32 | C35.1 10.77,42.89 10.14,43.53 U6.13 2.29,43.53 v2.29,43.43 2.29,45.9 2.94,46.54 9.8,46.54 10.66,47.41 10.66,50.1 11.49,50.93 13.51,50.93 13.98,51.4 13.98,54.02 13.46,54.55 | 12.83,54.55 12.83,54.22
  Bottom 0.2: U7.4 13.46,58.55 13.46,57.51 | 13.46,57.51 14.4,57.51 U7.2 | U7.13 17.01,56.23 17.01,56.33 | 13.46,57.51 13.46,54.55 13.12,54.22 12.83,54.22 C39.1 10.18,54.22
  Bottom 0.203: J3.26 41.88,5.86 J3.23 J3.20
AILERON
  Top 0.152: J3.06 25.28,10.29 25.99,11 31.8,11 32.66,11.87 IC1.41
ARMING_BUTTON  (via drill 0.35)
  Top 0.152: SW5.2 43.65,16.4 | 43.65,16.4 SW5.1 43.65,12.4 43.25,12 41.47,12 40.52,11.05 J3.24 | R23.1 47.8,16.4 43.65,16.4 | IC1.78 36.16,35.16 36.45,34.87 37.59,34.87 38.52,35.8 v39.6,35.8
  Bottom 0.152: J3.24 40.52,9.78 38.9,11.41 38.9,28.5 40.74,30.35 40.74,34.79 39.73,35.8 v39.6,35.8
AUX1  (via drill 0.35)
  Top 0.152: v41.38,26.11 | J3.15 32.9,9.46 33.35,9.91 34.88,9.91 35.71,10.73 35.71,14.02 35.95,14.26 41.34,14.26 41.63,14.54 v41.63,18.86 | IC1.59 39.02,26.37 39.73,26.37 40,26.11 v41.38,26.11
  Bottom 0.152: v41.38,26.11 41.7,26.11 41.7,18.93 v41.63,18.86
AUX2  (via drill 0.35)
  Top 0.152: IC1.60 38.9,27.05 40.59,27.05 40.74,27.2 42.85,27.2 v42.85,26.69 | v42.63,19.38 42.63,13.56 42.12,13.06 36.88,13.06 36.57,12.75 36.57,9.49 35.58,9.49 35.23,9.13 35.23,8.4 J3.18
  Bottom 0.152: v42.85,26.69 42.85,19.61 v42.63,19.38
BARO_CS  (via drill 0.35)
  Top 0.152: 14.6,12.93 R24.2 14.6,13.63 14.97,14 v21.36,14 25.62,14 26.16,14.55 IC1.28 | A1.4 21,2.57 21,4.77 A1.5 20.22,10 v21,10
  Bottom 0.152: v21,10 21,14 v21.36,14
BIND  (via drill 0.35)
  Top 0.152: 32.79,50.3 R7.1 32.79,51.02 32.47,51.34 SW1.1 | SW1.1 31.17,52.52 31.51,52.85 v32.2,52.85 | SW1.1 SW1.2
  Bottom 0.152: IC2.27 34.66,52.87 32.23,52.87 v32.2,52.85
BLINK
  Top 0.152: R11.1 IC1.80
BOOT0
  Top 0.152: IC1.94 28.16,38.74 28.46,39.04 28.46,42.55 SW3.1 | SW3.1 SW3.2 | R10.1 32.84,42.55 SW3.1
BUZZER  (via drill 0.35)
  Top 0.152: R22.1 29.89,18.81 v29.87,18.81 | v33.44,33.33 33.44,34.53 33.74,34.83 35.41,34.83 35.66,35.09 IC1.79 | v19.31,15.66 21.13,15.66 21.7,16.23 22.82,16.23 23.05,16.46 Q1.1
  Bottom 0.152: v29.87,18.81 29.87,29.77 29.88,29.77 v33.44,33.33 | v29.87,18.81 20.98,18.81 19.31,17.14 v19.31,15.66 | v29.87,18.81 35.67,18.81 37.98,16.5 J3.21
D13  (via drill 0.35)
  Top 0.152: R6.1 29.94,53.78 33.07,53.78 33.56,53.3 v33.56,52.2
  Bottom 0.152: IC2.26 34.16,52.2 v33.56,52.2
D+
  Bottom 0.152: J1.3 44.91,57.84 45.37,58.29 46.86,58.29 47.3,57.85 47.3,55.01 46.88,54.59 39.59,54.59 39.31,54.87 38.35,54.87 38.16,54.68 IC2.34
D-
  Bottom 0.152: J1.2 44.26,55.11 44.1,54.95 40.12,54.95 39.9,55.18 38.08,55.18 37.66,54.76 IC2.33
DIO0  (via drill 0.35)
  Top 0.152: v27.01,48.53 27.01,46.79 v26.08,45.86
  Bottom 0.152: U6.14 15.2,45.53 18.18,48.51 26.64,48.51 26.83,48.71 v27.01,48.53 | v26.08,45.86 26.39,45.86 26.74,46.22 28.34,46.22 28.54,46.02 28.54,44.09 28.74,43.88 30.23,43.88 30.26,43.9 IC2.14
ELEVATOR
  Top 0.152: J3.09 27.82,10.11 28.41,10.7 32.7,10.7 33.66,11.66 IC1.43
FILTERED-3.3V  (via drill 0.35)
  Top 0.152: 13.46,33.56 13.07,33.17 U3.8 | 13.46,33.56 15.03,33.56 15.29,33.31 U3.5 | 13.46,33.56 13.46,35.11 13.19,35.38 10.57,35.38 10.23,35.04 FB3.1 10.26,33.56 10.26,31.4 C14.1 C15.1 C17.1 10.22,27.81 R16.1 10.97,25.11 11.16,24.92 11.16,17.89 10.92,17.64 v6.32,17.64 | R24.1 14.6,10.96 12.45,10.96 12.11,10.62 12.11,8.84 | 14.46,4.34 C26.1 | C26.1 12.1,3.98 11.45,4.63 11.45,8.84 | v10.19,8.84 11.45,8.84 | 11.45,8.84 11.98,8.84 12.11,8.84 | 12.11,8.84 12.11,8.68 12.43,8.36 14.52,8.36 C24.1 | A1.1 14.46,2.57 C26.1
  Bottom 0.152: v6.32,17.64 6.32,12.71 v10.19,8.84
GND  (via drill 0.2, 0.35)
  Top 0.152: C18.2 18.15,26.67 C16.2 16.49,28.43 U3.2 U3.3 | C7.2 C8.2 C9.2 | AE1.3 12.65,60.18 v12.65,59.97 | AE1.2 7.33,60.66 v7.33,60.6
  other vias: 37.9,19.31 35.29,16.21 12.63,17.61 14.93,15.69 23.07,35.51 27.11,33.54 27.8,29.09 23.97,50.28 29.38,49.19 43.95,59.87 52.41,57.8 25,30.39 16.89,26.25 14.18,32.51 12.45,30.84 6.28,30.62 2.49,30.44 30.63,13.58 35.4,47.29 25.47,43.8 29.7,37.61 20.78,17.59 18.4,19.3 16.73,34.27 14.13,35.06 11.89,34.34 9,37.45 47.77,2.74 18.31,10.39 36.58,13.63 24.84,17.82 23.46,20.93 39.95,51.07 35.65,52.85 38.94,47.24 38.96,54.24 40.64,41.97 38.02,36.75 4.83,53.87 8.49,55.86 5.3,58.45 2.13,53.24 2.13,53.97 2.13,54.68 2.32,55.39 8.48,55.12 4.92,57.85 6.25,53.87 8.45,54.39 6.52,60.6 5.3,59.91 5.3,59.17 5.75,60.6 12.67,60.64 12.64,59.33 2.73,35.82 7.41,35.56 3.91,33.82 5.89,33.82 5.87,32.78 5.87,31.79 3.9,32.78 3.9,31.79 3.9,30.53 3.9,29.45 3.9,28.36 3.9,27.23 3.9,26.19 5.89,29.45 5.89,28.36 5.89,27.23 5.89,26.19 4.23,25.02 5.4,25.02 4.23,23.95 5.4,23.95 2.9,23.04 2.9,21.77 4.2,20.43 6.81,23.04 6.81,21.77 5.33,20.43 52.42,30.15 18.06,12.91 35.14,57.66 4.13,54.21 12.71,49.24 6.3,56.6 6.9,57.09 7.37,57.94 9.27,55.91 2.86,55.85 3.36,56.37 3.84,56.82 5.54,53.87 7.71,57.34 10.06,55.91 10.82,55.91 11.59,55.91 12.43,56.59 12.46,57.29 12.47,57.99 12.5,58.67 7.54,58.71 4.45,57.29 7.62,56.67 4.13,53.24
  pour Top: -2.09,-2.31 54.97,-2.31 54.97,63.74 -1.53,63.74 -1.54,63.74 -1.55,63.74 -1.56,63.74 -1.56,63.74 -1.57,63.74 -1.58,63.75 -1.59,63.75 -1.59,63.76 -1.59,63.76 -1.6,63.77 -1.61,63.77 -1.61,63.78 -2.09,64.38
  pour Bottom: -2.71,-2.93 55.12,-2.93 55.12,64.36 -2.71,64.36
GPS-HEALTH
  Top 0.152: R19.1 44.27,21.59 42.16,21.59 41.8,21.95 41.8,22.59 41.39,22.99 IC1.52
GPS_ANT1
  Top 0.813: U2.11 3.17,54.76 3.63,55.22 | 3.63,55.22 6.39,57.98 6.39,59.5 6.6,59.71 AE1.1 | C1.1 3.63,55.22
GYRO_CS  (via drill 0.35)
  Top 0.152: U3.12 14.28,26.16 13.63,26.16 v13.63,26.13 13.14,26.13 R16.2 | IC1.86 32.04,36.35 32.04,37.2 31.26,37.2 v29.75,38.71
  Bottom 0.152: v13.63,26.13 14.07,26.13 14.07,30.37 15.86,32.16 27.77,32.16 28.6,32.99 28.6,37.55 v29.75,38.71
I2C1_SCL  (via drill 0.35)
  Top 0.152: IC1.95 27.72,36.23 v27.72,39.76 27.91,39.76 27.91,40.8 26.84,41.87 22.34,41.87 21.09,43.12 21.09,49.72 22.52,51.15 JP2.3 JP1.3 22.52,59.05 22.85,59.39 R2.2 | U2.19 10.57,40.97 10.83,41.22 23.29,41.22 23.65,40.86 23.65,38.67 24.15,38.17 v26.16,38.17
  Bottom 0.152: 27.72,39.65 26.24,38.17 v26.16,38.17 | 27.72,39.65 v27.72,39.76 | 27.72,39.65 27.77,39.65
  Bottom 0.2: U7.1 14.68,56.77 14.68,55.09
  Bottom 0.203: JP2.3 22.65,53.22 22.65,51.7 22.13,51.17 15.71,51.17 14.68,52.21 14.68,55.09
I2C1_SDA
  Top 0.152: IC1.96 27.17,38.95 26.97,39.16 26.97,40.74 26.16,41.55 20.71,41.55 19.98,42.28 JP2.4 | U2.18 9.47,41.24 9.93,41.7 19.38,41.7 19.98,42.29 JP2.4 | JP2.4 JP1.4 19.98,59.49 R1.2
  Bottom 0.2: U7.16 15.28,56.23 15.28,55.45
  Bottom 0.203: JP2.4 19.71,52.95 15.98,52.95 15.28,53.64 15.28,55.45
IMU-HEALTH
  Top 0.152: 44.3,25.13 R15.1
  Top 0.203: IC1.54 40.52,23.99 40.76,24.23 40.76,24.71 41.02,24.97 44.07,24.97 R15.1
IMU_INT1
  Top 0.152: U3.4 15.93,29.46 15.93,33.78 15.62,34.08 14.96,34.08 14.77,34.27 14.77,36.7 15.09,37.02 18.56,37.02 19.28,36.3 19.28,35.52 19.73,35.07 19.73,34.49 IC1.1
IMU_INT2  (via drill 0.35)
  Top 0.152: IC1.2 19.02,33.99 v19.02,34.05 | U3.9 12.04,28.95 11.74,29.25 11.74,32.77 11.98,33.02 v12.44,33.02
  Bottom 0.152: v19.02,34.05 19.02,34.01 17.27,34.01 17.27,33.22 12.44,33.22 v12.44,33.02
LORA_ANT
  Bottom 0.152: U4.1 4.83,35.53 U6.9
LORA_RESET
  Bottom 0.152: U6.6 20.44,39.58 18.31,39.58 17.8,40.09 17.8,44.14 18.19,44.53 24.76,44.53 24.76,43.09 26.18,43.09 26.18,43.4 IC2.13
MAGNATOMETER-HEALTH
  Top 0.152: 44.02,20.13 44.25,20.13 R20.1 44.27,20.54 41.18,20.54 40.8,20.92 40.8,22.16 40.46,22.49 IC1.51
MISO
  Bottom 0.152: IC2.21 32.15,47.41 29.32,47.41 29.32,47.53 U6.2
MOSI
  Bottom 0.152: U6.3 24.39,45.53 24.98,46.12 25.38,46.52 32.16,46.52 IC2.19
N$1
  Top 0.152: IC1.73 40.66,33.49 40.87,33.7 40.87,38.89 38.77,38.89 C9.1
N$2
  Top 0.152: C23.1 36.18,18.87 36.18,20.75 IC1.48
N$3
  Top 0.152: IC1.20 21.93,24.99 21.93,24.49 | 21.93,24.49 21.93,21.94 21.62,21.63 17.2,21.63 | 17.2,21.63 FB4.2 | 21.93,24.49 IC1.21 | C21.1 C19.1 17.2,20.01 17.2,21.63
N$4
  Top 0.152: U2.8 6.47,53.07 6.97,53.57 10.41,53.57 13.28,56.44 R4.1
N$5
  Top 0.152: R21.2 4.32,16.43 3.36,15.47 3.36,6.24 4.31,5.29 LS1.1
N$6
  Top 0.152: Q1.3 25.1,15.07 24.75,14.72 12.6,14.72 12.02,14.15 12.02,12.6 11.59,12.17 8.2,12.17 LS1.2
N$7
  Top 0.152: LED4.A 46.17,25.05 R15.2
N$8
  Top 0.152: R11.2 31.56,40.62 STATUS.A
N$9
  Top 0.152: U1.2 39.07,55.53 36.13,55.53 | 36.13,55.53 34.6,55.53 | 34.6,55.53 33.27,55.53 U1.4 | 32.71,46.24 C6.1 | 34.6,51.25 34.6,55.53 | 32.71,46.24 36.83,46.24 C5.1 | 34.6,51.25 C4.1 | 32.71,46.24 32.71,47.25 33.05,47.59 34.29,47.59 34.6,47.9 34.6,51.25 | FB1.1 45.1,59.02 36.76,59.02 36.13,58.39 36.13,55.53
N$11
  Top 0.152: 51.54,47.2 D1.C | D1.C 51.62,46.93 | 43.99,51.36 C2.1 43.83,50.87 44.03,50.87 | 45.61,50.8 45.61,51.34 C3.1 44.03,51.34 44.03,50.87 | D1.C 51.54,49.87 51.04,50.38 48.41,50.38 48.03,50.76 48.03,50.8 | U1.3 42.02,58.21 42.47,57.75 42.47,51.01 42.76,50.72 44.03,50.72 44.03,50.87
  Top 0.203: FB2.2 48.03,50.8 45.61,50.8
N$12
  Top 0.152: LED5.A 46.17,23.42 R18.2
N$13
  Bottom 0.152: IC2.43 40.66,45.84 42.1,45.84 42.1,51.35 C28.1
N$14
  Top 0.152: LED6.A R19.2
N$15
  Top 0.152: LED7.A 46.17,20.24 R20.2
N$16
  Bottom 0.152: IC2.2 38.66,40.17 37.85,39.36 37,39.01 36.66,38.66 XTAL1.1 36.66,34.45 C34.1
N$17
  Bottom 0.152: IC2.1 XTAL1.2 | XTAL1.2 | XTAL1.2 38.79,37.69 C33.1
N$19
  Top 0.152: R6.2 29.85,57.5 BLINK.A
N$27
  Bottom 0.152: U7.10 18.46,58.05 18.46,59.01 18.96,59.5 C38.1
N$30
  Top 0.152: PWR.A 34.64,59.91 R3.2
N$33
  Top 0.152: 46.48,42.63 46.48,42.61 | R9.1 48.86,42.59 49.3,42.16 49.3,37.96 48.97,37.63 47.7,37.63 47.7,37.42 J2.A5
N$34
  Top 0.152: R12.1 42.27,35.7 42.48,35.92 J2.B5
NRST  (via drill 0.35)
  Top 0.152: IC1.14 23.42,27.97 22.05,27.97 21.12,27.05 20.42,27.05 C18.1 20.04,25 R17.2 20.22,24.98 v20.22,23.58 | v14.38,23.06 12.23,23.06 SW4.1 SW4.2
  Bottom 0.152: v14.38,23.06 16.32,25 19.68,25 20.22,24.47 v20.22,23.58
NSS
  Bottom 0.152: U6.5 20.78,41.23 31.44,41.23 32.05,40.63 34.16,40.63 IC2.11
OSC-IN
  Top 0.152: C12.1 17.69,33.18 17.9,32.97 Y1.1 19.95,32.97 20.2,32.72 20.2,30.03 20.51,29.73 21.27,29.73 21.99,29 IC1.12
OSC-OUT
  Top 0.152: Y1.3 17.75,31.17 17.95,30.97 17.95,30.09 18.27,29.77 19.42,29.77 19.63,29.56 19.63,28.49 20.05,28.49 | IC1.13 20.05,28.49 | 20.05,28.49 C16.1
PRESSURE-HEALTH
  Top 0.203: IC1.53 44.27,23.49 R18.1
RCIN_SBUS  (via drill 0.35)
  Top 0.152: IC1.64 41.9,28.99 v41.9,29.85
  Bottom 0.152: J3.30 45.6,27.78 43.52,29.85 v41.9,29.85 v41.89,29.85 41.89,41.23 42.57,41.91 48.84,41.91 49.42,42.49 49.42,52.63 48.81,53.23 44.72,53.23 43.57,52.08 41.17,52.08 40.59,51.49 40.59,48.97 IC2.37
RESET  (via drill 0.35)
  Top 0.152: v41.43,50.37 41.43,49.44 SW2.2 | SW2.2 SW2.1 | 43.23,49.2 R8.1 43.25,49.44 SW2.2
  Bottom 0.152: IC2.40 40.66,47.52 41.69,47.52 41.69,49.28 41.43,49.28 v41.43,50.37
RUDDER
  Top 0.152: J3.12 30.36,9.65 31.05,10.34 33.32,10.34 34.16,11.18 IC1.44
SCK  (via drill 0.35)
  Top 0.152: v23.18,43.47 23.18,46.67 v23.23,46.67
  Bottom 0.152: U6.4 23.18,43.53 v23.18,43.47 | v23.23,46.67 23.23,46.69 23.97,46.69 23.97,46.9 IC2.20
SCL
  Bottom 0.152: IC2.32 37.16,56 36.74,56.42 35.05,56.42 34.69,56.06 34.69,54.53 U5.6
SDA
  Bottom 0.152: U5.5 36.23,54.52 36.66,54.09 IC2.31
SPI1_MISO  (via drill 0.35)
  Top 0.152: IC1.30 27.16,13.61 v27.19,13.58 | v29.2,12.69 29.2,11.73 29.1,11.73 29.1,11.66 19.36,11.66 18.97,11.26 A1.6 18.97,4.3 19.19,4.3
  Bottom 0.152: v29.2,12.69 27.19,12.69 v27.19,13.58
SPI1_MOSI
  Top 0.152: IC1.31 27.66,17.62 27.82,17.47 27.82,12.81 27.38,12.38 18.4,12.38 17.72,11.7 A1.7
SPI1_SCK
  Top 0.152: IC1.29 26.58,20.68 26.58,13.83 26.15,13.4 18.32,13.4 18.28,13.44 17.84,13.44 16.47,12.07 A1.8
SPI2_MISO
  Top 0.152: U3.1 16.43,27.89 16.18,27.89 16.18,23.22 16.49,22.92 20.9,22.92 21.09,23.11 21.09,26.15 21.43,26.49 IC1.17
SPI2_MOSI
  Top 0.152: U3.14 15.28,26.28 15.88,25.69 15.88,22.93 16.23,22.57 21.24,22.57 21.51,22.84 21.51,25.79 21.71,25.99 IC1.18
SPI2_SCK  (via drill 0.35)
  Top 0.152: IC1.84 33.16,38.27 32.86,38.58 31.84,38.58 31.27,39.15 v31.19,39.08 | U3.13 v14.78,25.1 v14.77,25.1
  Bottom 0.152: v31.19,39.08 30.84,39.08 30.84,33.63 | v14.77,25.1 14.77,29.97 16.3,31.5 28.91,31.5 30.42,33.02 30.84,33.63 | 30.84,33.63
SWCLK
  Bottom 0.152: 47.58,48.62 JP3.1 47.56,47.95 46.9,47.3 46.43,46.83 46.43,43.02 46.21,42.8 43.73,42.8 43.47,43.06 R25.2 43.47,44.56 43.13,44.9 IC2.45
SWDIO
  Bottom 0.152: IC2.46 41.81,44.4 42.23,43.98 42.23,42.98 42.82,42.39 47.14,42.39 47.56,42.81 JP3.2
THROTTLE
  Top 0.152: J3.03 22.74,10.53 23.52,11.31 31.09,11.31 31.66,11.88 IC1.39
USART6_TX  (via drill 0.35)
  Top 0.152: IC1.63 40.38,28.49 40.76,28.11 v42.09,28.11
  Bottom 0.152: J3.27 43.06,8.42 44.54,9.91 44.54,27.22 43.65,28.11 v42.09,28.11
USB_5V  (via drill 0.35)
  Top 0.152: 45.91,37.92 J2.A4 | 45.91,37.92 J2.B9 | J2.A9 45.84,35.42 | 45.84,35.42 J2.B4 | 45.91,37.92 45.91,38.56 v45.9,38.56 | 45.84,35.42 45.84,34.68 v45.95,34.68 | D1.A 51.54,38.35 v51.28,38.09 | R13.1 48.94,27.45 v48.94,27.46
  Top 0.203: J1.1 43.41,56.56 43.41,57.58 43.88,58.05 48.71,58.05 49.81,56.95 49.81,55.48 52.59,52.7 52.59,43.23 D1.A
  Bottom 0.152: v48.94,27.46 48.94,32.57 49.72,33.35 49.72,35.73 | 49.72,37.9 49.72,39.7 48.75,40.67 48.04,40.67 46.44,39.07 46.4,39.07 v45.9,38.56 | 49.72,35.73 49.72,37.9 | v51.28,38.09 51.28,37.9 49.72,37.9 | 49.72,35.73 49.63,35.63 46.9,35.63 v45.95,34.68
USB_D+
  Top 0.152: IC1.71 40.89,32.49 41.22,32.82 41.22,36.02 41.61,36.42 43.35,36.42 J2.B6 45.87,36.42 45.87,36.92 J2.A6 | J2.A6
USB_D−  (via drill 0.35)
  Top 0.152: IC1.70 44.89,31.99 45.32,31.57 46.44,31.57 46.86,31.99 48.51,31.99 49.3,32.78 49.3,36.18 48.55,36.92 v48.54,36.92 48.54,36.42 J2.A7 | J2.B7 43.49,36.92 v43.49,37.05
  Bottom 0.152: v43.49,37.05 43.6,36.94 48.54,36.94 v48.54,36.92
USB_VBUS_SENSE
  Top 0.152: IC1.68 44.57,30.99 44.86,30.7 44.86,29.35 | R14.1 44.71,29.35 44.86,29.35 | 44.86,29.35 R13.2
(copper drawn outside any net)
  shapes: Bottom area x1, Top area x1

## Text on the board
tNames: - | - | + | M0 | GPS | D | C | - | - | C | - | BIND | rst | Boot | + | D | Status | STM32 | 1 | ASCEND / FC Arduplane V2 | STM32 | IMU | - | IMU | BARO | GPS | MAG | RST | - | ARM | - | Throttle | Aileron | Elevator | Rudder | AUX1 | AUX2 | Buzzer | Arm | UART6 | SBUS | 2026 / Mike Walach | BARO | +
bNames: Mag | FRAM | SAMD21g18 M0 | LoRa | ASCEND Flight Controller | Mike Walach 2026 Rev.1